# Altium PCB ePBR25_ACU_Power_rev0.PcbDoc (part 3 of 5)
Units mil, origin at the board's own origin, x right, y up, seen from the top; angles counter-clockwise.
Board outline 8211 x 3959 mil, 2 copper layers (Top Layer, Bottom Layer); 145 components, 129 nets, 544 pads, 1610 vias.
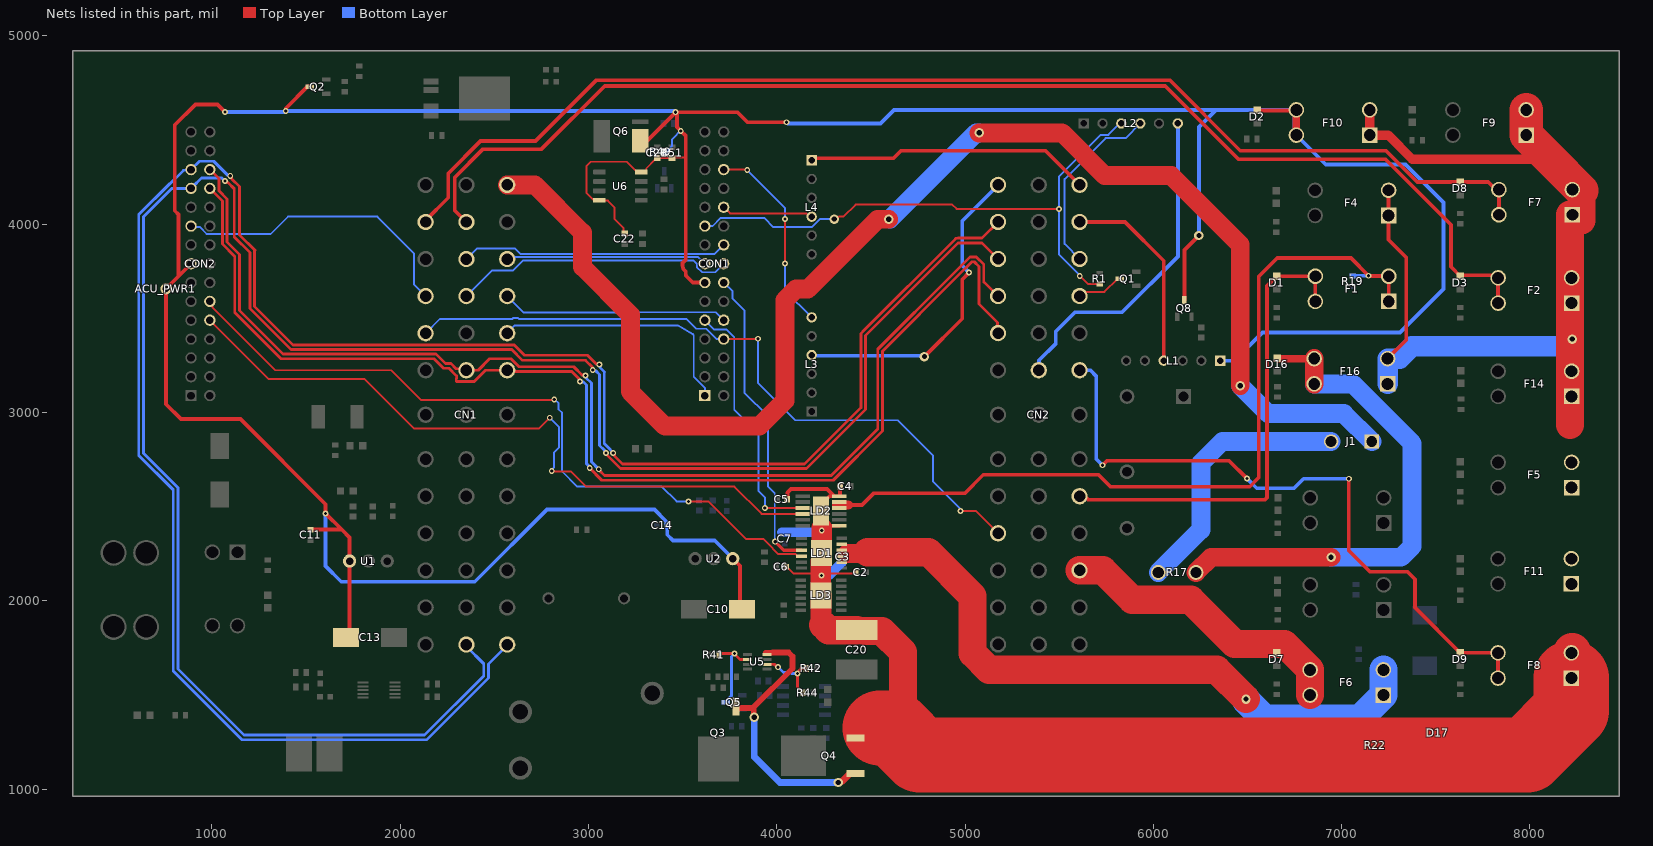
[diagram p2: the nets of this part, all layers, seen from the top]

## Via types
v1: diameter 31, hole 17, Top Layer to Bottom Layer, 1578 vias
v2: diameter 50, hole 28, Top Layer to Bottom Layer, 24 vias
v3: diameter 30, hole 15, Top Layer to Bottom Layer, 3 vias
v4: diameter 170, hole 128, Top Layer to Bottom Layer, 2 vias
v5: diameter 250, hole 137, Top Layer to Bottom Layer, 2 vias
v6: diameter 60, hole 34, Top Layer to Bottom Layer, 1 vias

## Nets (pads, with @x,y where several pads share a name; then routed paths per layer and width w, separated by ;. In a path a pad name is that pad's centre, name@x,y a point inside that pad or via, vN(x,y) a via of type N, cw(c..) or ccw(c..) an arc to the next point about the centre after c; other vN are vias at no path point) (continued)
ACU_PWR: ACU_PWR1.1 C10.1 C11.2 C13.1 C14.2 C21.2 C22.2 CON1.A7 CON2.A8 D2.1 F10.3 F10.4 L1.1 Q2.3 Q6.1-3 Q8.3 R49.2 R51.2 U1.1 U2.1 U6.4 U6.8 | length 19688.4
  Top Layer w10: C22.2@3192.56,3955 3191.89,3955 3185.58,3961.31 3185.58,3979.89 3148.19,4017.28 3137.44,4028.03 3137.44,4090.12 3102.56,4125 3030,4125 2990,4165 2990,4310 3011.36,4331.36 3203.64,4331.36 3260,4275 U6.4@3276.22,4275 ; U6.4@3280,4277 3298.86,4277 3306.66,4284.8 3306.66,4295.71 3352.49,4341.54 3363.24,4352.29 C21.2@3365.21,4352.29 R51.2@3443.7,4352.29 3446.41,4355 3517,4355
  Top Layer w20: CON2.A8@889,3790 822.5,3723.5 ; v1@1069,4598.98 v1(1069,4596) 1029,4636 912.18,4636 802.82,4526.63 802.82,4071.37 822.5,4051.68 822.5,3723.5 ; v1(1391.91,4600.97) 1391.91,4615.03 1507.88,4731 Q2.3@1518.71,4731 ; C11.2@1523.7,2377.84 1689.22,2377.84 ; C13.1@1712.05,1805 1731,1823.95 U1.1@1731,2211 1731,2336.06 1689.22,2377.84 ; Q6.1-3@3310.51,4441.16 v1@3462.4,4593.05 ; v1@3469.38,4585.05 3469.38,4515.62 v1(3490,4495) 3517,4468 3517,4355 3517,3811.96 3499,3793.96 3499,3779.88 3503.01,3761.89 3517,3747.9 3517,3727.04 3522.86,3721.18 3554.04,3690 CON1.A7@3618.02,3690 ; v1@3469.38,4595 3790,4595 3844.02,4540.98 v1(4051,4540.98) ; U2.1@3766,2224 3804.38,2185.62 3804.38,1966.57 C10.1@3815.95,1955 ; Q8.3@6164.92,3597.14 6164.92,3862.77 v2(6241.88,3939.72) ; D2.1@6551,4604.46 F10.4@6756.65,4604.46 ; 822.5,3723.5 ACU_PWR1.1@756,3657 756,3044 835.26,2964.74 1151.21,2964.74 1603.06,2512.9 v1(1603.06,2464) 1689.22,2377.84
  Top Layer w40: F10.4@6756.65,4604.46 F10.4@6759.12,4606.93 F10.3@6759.12,4473.07
  Bottom Layer w10: R49.2@3411.47,4385.42 3443.7,4417.66 3443.7,4451.14 3452.56,4460 3487.56,4495 v1(3490,4495)
  Bottom Layer w20: v1(1069,4596) 1383.97,4596 1388.94,4600.97 v1(1391.91,4600.97) 3453.46,4600.97 3459.43,4595 v1(3462.4,4595) ; v1(1603.06,2464) 1603.06,2184.24 1686.38,2100.92 2396.2,2100.92 2779.53,2484.25 3349.81,2484.25 3413,2421.06 3413,2405 C14.2@3418,2400 3418,2350.46 3448.96,2319.5 3670.5,2319.5 U2.1@3766,2224 ; CON1.A7@3618.02,3690 CON1.A7@3628.9,3690 ; v1(4051,4540.98) 4053.98,4540.98 4059.96,4535 4550.96,4535 4622.89,4606.93 6332.14,4606.93 ; v2(6241.88,3939.72) 6241.88,4516.66 6332.14,4606.93 ; L1.1@6355,3275 6429,3275 6579,3425 7309.7,3425 7540.04,3655.34 7540.04,4115.38 7338.42,4317 6915.19,4317 F10.3@6759.12,4473.07 ; F10.4@6759.12,4606.93 6332.14,4606.93
  Bottom Layer w40: F10.3@6759.12,4473.07 F10.4@6759.12,4606.93
AIR+_CTRL: CN1.8 CON1.B9 | length 1420.9
  Bottom Layer w10: CN1.8@2351.54,3814.77 2406.84,3870.08 2609.92,3870.08 2638,3842 3670.02,3842 CON1.B9@3718.02,3890
AIR+_FB: CN1.10 CON1.B5 | length 1204.4
  Bottom Layer w10: CN1.10@2568.07,3617.92 2655.49,3530.5 3164.74,3530.5 3166.5,3532.26 3675.75,3532.26 CON1.B5@3718.02,3490
AIR-_CTRL: CN1.11 CON1.B8 | length 1499.6
  Bottom Layer w10: CN1.11@2351.54,3617.92 2488.61,3755 2600,3755 2653,3808 3557,3808 3575.9,3789.1 3575.9,3772.55 3603.45,3745 3673.02,3745 CON1.B8@3718.02,3790
AIR-_FB: CN1.15 CN2.30 CON1.B4 | length 3774.1
  Top Layer w10: CON1.B4@3719,3390 3719.94,3390.94 3898.98,3390.94 v1(3899.92,3391.89) ; v1(4975.4,2477) 5056.39,2477 5175.31,2358.08 CN2.30@5175.98,2358.08
  Bottom Layer w10: CN1.15@2135,3421.07 2210.43,3496.5 2595.42,3496.5 2601.32,3502.4 2625.34,3502.4 2631.24,3496.5 3521.5,3496.5 3524.43,3493.57 3573,3445 3626.08,3445 3681.08,3390 CON1.B4@3718.02,3390 ; v1(3899.92,3391.89) 3899.92,3157.69 4099.11,2958.5 4643.5,2958.5 4829,2773 4829,2634.73 4971.38,2492.35 4971.38,2481.02 v1(4975.4,2477)
AMBER_LED_GND: CN2.4 L1.4 | length 1091.6
  Top Layer w20: CN2.4@5608,4012 5848.84,4012 6055,3805.84 L1.4@6055,3275
  Bottom Layer w10: CN2.4@5602.65,4018.5 5592.5,4018.5 5599,4012 CN2.4@5608,4012
AMS_CLR_ERR: CN1.7 CON1.A8 | length 1068.7
  Bottom Layer w10: CN1.7@2568.07,3814.77 2578.3,3825 3583.02,3825 CON1.A8@3618.02,3790
AMS_LED: CN2.1 L4.1 | length 1520
  Top Layer w20: L4.1@4185,4340 4195,4350 4620,4350 4660,4390 5427.53,4390 CN2.1@5609.06,4208.47
AMS_OK: CON1.B11 L4.4 | length 486.7
  Top Layer w10: CON1.B11@3719,4090 3752,4057 4156.62,4057 4173.62,4040 L4.4@4185,4040
AMS_PWR: CN1.5 D3.1 F2.3 F2.4 | length 6689.3
  Top Layer w20: CN1.5@2351.54,4011.62 2290,4073.16 2290,4248.47 2440.09,4398.55 2751.05,4398.55 3086.5,4734 6063,4734 6452,4345 7232.15,4345 7580,3997.15 7580,3773.46 D3.1@7630,3723.46 7635.43,3728.9 F2.4@7830.12,3728.9 ; F2.3@7830.12,3589.61 F2.4@7830.12,3723.46
B\R\A\K\E\_\P\R\E\S\S\: CN2.10 Q1.3 | length 249.8
  Top Layer w10: CN2.10@5609.06,3617.92 5631.13,3640 5739.88,3640 5809.88,3710 Q1.3@5820.71,3710
BRAKE_LIGHT_GND: CN2.17 L2.6 | length 1763.3
  Bottom Layer w20: CN2.17@5392.52,3224.22 5392.52,3277.35 5482,3366.83 5482,3431 5582.97,3531.97 5833.97,3531.97 6130,3828 L2.6@6130,4535
BRAKE_PRESS: CON1.A10 L2.3 R1.1 | length 3121.9
  Top Layer w10: v2(4305,4027) 4315.82,4027 4328.82,4040 4353.89,4040 4418.32,4104.44 4931.38,4104.44 4954.82,4081 v1(5498,4081) ; v1(5609.06,3725) 5651.61,3682.44 R1.1@5715,3682.44
  Bottom Layer w10: CON1.A10@3618.02,3990 3658.45,3990 3700.57,4032.12 3935.15,4032.12 3982.27,3985 4185.89,3985 4227.89,4027 v2(4305,4027) ; v1(5609.06,3725) 5609.06,3729.6 5498,3840.66 v1(5498,4081) 5498,4252 5720,4474 5761,4474 5822,4535 L2.3@5830,4535
BRAKE_PWR: CN2.16 D9.1 F8.3 F8.4 | length 3607.1
  Top Layer w20: v1(5730,2720) 5730.07,2720 5754.07,2744 6402,2744 v1(6497,2649) ; v1(7038,2648) 7038,2267 7150.65,2154.35 7349.2,2154.35 7389.02,2114.53 7389.02,1964.44 D9.1@7630,1723.46 F8.4@7830.12,1723.46 F8.3@7830.12,1589.61
  Bottom Layer w20: CN2.16@5609.06,3224.22 5665.78,3224.22 5696,3194 5696,2754 v1(5730,2720) ; v1(6497,2649) 6548.5,2597.5 6747.5,2597.5 6798,2648 v1(7038,2648)
BRAKE_SENS: CN2.7 L2.4 | length 982
  Bottom Layer w10: CN2.7@5609.06,3814.77 5528.5,3895.33 5528.5,4239.5 5746,4457 5852,4457 L2.4@5930,4535
BSPD_LED: CN2.3 L3.4 | length 1706.4
  Top Layer w20: v2(4784,3297) 4985,3498 4985,3707.04 v1(5021.48,3743.52)
  Bottom Layer w20: L3.4@4185,3305 4189,3301 4780,3301 v2(4784,3297) ; v1(5021.48,3743.52) 4985,3780 4985,4017.49 CN2.3@5175.98,4208.47
BSPD_OK: CON1.B13 L3.6 | length 1049.9
  Top Layer w10: CON1.B13@3718.02,4290 3718.47,4289.55 3840.45,4289.55 v1(3843,4287) ; v1(4043,3790.98) v1(4043,4027.98)
  Bottom Layer w10: v1(3843,4287) 4043,4087 v1(4043,4027.98) ; v1(4043,3790.98) 4043,3647 L3.6@4185,3505
BSPD_TEST: CN1.1 J1.1 | length 7535.3
  Top Layer w100: CN1.1@2568.07,4208.47 2714.53,4208.47 2968,3955 2968,3773.13 3222.28,3518.85 3222.28,3110.69 3405.61,2927.36 3907.68,2927.36 4043,3062.68 4043,3596.5 4101.58,3655.08 4164.08,3655.08 4535.49,4026.49 v2(4594.09,4026.49) ; v2(5074.51,4485) 5515,4485 5742,4258 6094.83,4258 6461.53,3891.3 v2(6461.53,3142.46)
  Bottom Layer w100: v2@4602.09,4027.98 5059.11,4485 v2(5074.51,4485) ; v2(6461.53,3142.46) 6609.76,2994.23 7012.04,2994.23 J1.1@7160.27,2846
BSPD_TEST_OUT: J1.2 R17.2 | length 1413.6
  Bottom Layer w100: R17.2@6025.99,2150.41 6252,2376.42 6252,2731 6367,2846 J1.2@6943.74,2846
BSPD_TEST_PWR: D16.1 F16.3 F16.4 R17.1 | length 2730.3
  Top Layer w40: D16.1@6660.43,3285.93 F16.4@6854.12,3285.93
  Top Layer w100: R17.1@6225.99,2150.41 6306.58,2231 v2(6943.74,2231) ; F16.3@6854.12,3152.07 F16.4@6854.12,3285.93
  Bottom Layer w100: F16.3@6854.12,3152.07 7057.93,3152.07 7373.9,2836.1 7373.9,2289.58 7315.32,2231 v2(6943.74,2231)
BUZR_CTRL: CON1.A5 LD2.3 | length 1369
  Top Layer w10: v1(3936.5,2492.75) LD2.3@4137.56,2492.75
  Bottom Layer w10: CON1.A5@3618.02,3490 3668.02,3440 3734.17,3440 3773.92,3400.25 3773.92,3014.88 3902.92,2885.88 3902.92,2582.79 3936.5,2549.21 v1(3936.5,2492.75)
BUZR_FB: CON2.B5 LD2.4 | length 3813.4
  Top Layer w10: CON2.B5@989,3490 1302,3177 1810.5,3177 2073.5,2914 2736.74,2914 v1(2794.53,2971.78) ; v1(2805,2690) 2813,2690 2814,2691 2817.5,2687.5 2906.39,2687.5 2916.89,2677 2917.12,2677 2987.82,2606.3 3774.77,2606.3 3919.35,2461.72 4137.09,2461.72 LD2.4@4137.56,2461.25
  Bottom Layer w10: v1(2794.53,2971.78) 2842.5,2923.81 2842.5,2813.08 2816.5,2787.08 2816.5,2707.18 2805,2695.68 v1(2805,2690)
BUZR_FUSE: F1.1 F1.2 LD2.10 LD2.11 R19.1 | length 4414.3
  Top Layer w20: 4367.58,2507.24 4368.84,2508.5 ; 4379.66,2508.5 4452.11,2508.5 4514.15,2570.54 4997.74,2570.54 5096.44,2669.24 5709.13,2669.24 5772.37,2606 6512.04,2606 6558.96,2652.92 6558.96,3720.96 6658,3820 7049,3820 v1(7143,3726) 7144.27,3724.73 7248.61,3724.73 F1.2@7249.88,3723.46 F1.1@7249.88,3589.61
  Top Layer w50: 4317.36,2508.5 4379.66,2508.5
  Bottom Layer w20: R19.1@7058.22,3725.78 7142.78,3725.78 v1(7143,3726)
BUZR_PWR: CN2.25 D1.1 F1.3 F1.4 | length 2542.1
  Top Layer w20: CN2.25@5609.06,2554.93 5621.42,2542.56 5647.46,2542.56 5653.02,2537 6592.28,2537 6604,2548.72 6604,3672.46 D1.1@6655,3723.46 F1.4@6860.12,3723.46 F1.3@6860.12,3589.61
CAN_N: CN1.37 CN2.6 CON2.A13 | length 11361.9
  Top Layer w15: v1(1097.65,4256.77) 1097.65,4252.44 1105.18,4244.91 1105.18,4240.56 1146.19,4199.54 1146.19,3943.42 1228,3861.61 1226.97,3860.57 1226.97,3562.18 1430.18,3358.97 2603.08,3358.97 2604.11,3360 2660.24,3303.87 2995.19,3303.87 3041,3258.06 3054.5,3258.06 v1(3057.56,3255) ; v1(3130.91,2785.24) 3130.91,2780.91 3138.41,2773.41 3138.41,2768.99 3180.48,2726.91 4147.93,2726.91 4446.58,3025.56 4446.58,3419.74 4461.22,3434.39 4937.57,3910.74 4952.22,3925.38 4961.57,3925.38 4961.98,3925.8 5090.16,3925.8 CN2.6@5175.98,4011.62
  Bottom Layer w15: v1(1097.65,4256.77) 1094.59,4259.83 1084.14,4259.83 1009.35,4334.62 933.62,4334.62 CON2.A13@889,4290 885.07,4286.07 848.52,4286.07 777.45,4215 776.17,4215 611,4049.83 611,4039.47 611,2783.39 611,2773.03 794.28,2589.75 794.28,1627.37 1152.85,1268.79 1160.17,1261.47 2139.97,1261.47 2468.59,1590.09 2468.59,1663.97 2561.38,1756.76 2561.38,1759.82 CN1.37@2568.07,1767.53 ; v1(3057.56,3255) 3060.62,3251.94 3060.62,3239.24 3084.94,3214.92 3083.69,3213.68 3083.69,2835.1 3104.76,2814.03 3130.91,2787.88 v1(3130.91,2785.24)
CAN_P: CN1.38 CN2.9 CON2.A12 | length 11163.8
  Top Layer w15: v1(1069,4229.17) 1073.33,4229.17 1080.86,4221.64 1085.21,4221.64 1118.7,4188.15 1118.7,3932.03 1201.97,3848.76 1201.97,3551.83 1419.83,3333.97 2592.15,3333.97 2649.11,3277 2984.06,3277 3019.5,3241.56 3019.5,3228.06 v1(3022.56,3225) ; v1(3092.34,2784.03) 3092.34,2779.7 3113.41,2758.63 3170.13,2701.91 4158.28,2701.91 4471.58,3015.21 4471.58,3409.39 4962.57,3900.38 5089.69,3900.38 CN2.9@5174.93,3815.15
  Bottom Layer w15: v1(1069,4229.17) 1068.43,4229.17 1052.21,4245.38 944.38,4245.38 897.96,4198.96 889,4198.96 CON2.A12@889,4190 786.53,4190 636,4039.47 636,2783.39 819.28,2600.11 819.28,1637.72 1170.53,1286.47 2129.61,1286.47 2443.59,1600.45 2443.59,1665.83 CN1.38@2351.54,1757.88 ; v1(3022.56,3225) 3025.62,3221.94 3038.32,3221.94 3058.69,3201.57 3058.69,2824.75 3084.34,2799.1 3084.34,2796.36 3092.34,2788.36 v1(3092.34,2784.03)
CAN_SENS_N: CN1.17 CN2.12 CON2.B13 | length 6375.8
  Top Layer w15: CON2.B13@989,4290 1037,4242 1037,4177.36 1080.39,4133.97 1080.39,3905.37 1146.19,3839.56 1146.19,3541.93 1377.62,3310.5 1786.75,3310.5 2189.85,3310.5 2240.33,3260.03 2269.33,3260.03 2296.8,3232.56 2343.2,3232.56 CN1.17@2351.54,3224.22 2414.22,3224.22 2475,3285 2589.04,3285 2631.1,3242.95 2921.4,3242.95 2964.53,3199.81 2981,3199.81 v1(2984.06,3196.75) ; v1(3054.5,2698.84) 3054.5,2695.94 3085.22,2665.22 4289.22,2665.22 4536,2912 4536,3335.82 4935.5,3735.32 5025.8,3825.63 5058.94,3825.63 5099.51,3785.06 5099.51,3693.72 CN2.12@5174.93,3618.3
  Bottom Layer w15: v1(2984.06,3196.75) 2987.12,3193.69 2987.12,3183.69 3015.14,3155.67 3015.14,2738.19 v1(3054.5,2698.84)
CAN_SENS_P: CN1.16 CN2.15 CON2.B12 | length 6493.7
  Top Layer w15: CON2.B12@989,4190 1055.39,4123.61 1055.39,3895.01 1121.19,3829.21 1121.19,3531.57 1367.26,3285.5 1797.11,3285.5 2168.03,3285.5 2179.5,3285.5 2229.97,3235.03 2258.98,3235.03 2299.88,3194.13 2299.88,3181.7 2297.8,3179.63 2297.8,3167.2 2300,3165 2393.46,3165 2452.68,3224.22 CN1.16@2568.07,3224.22 2574.34,3217.95 2911.04,3217.95 2951,3177.99 2951,3167.39 v1(2954.06,3164.33) ; v1(3006.39,2704.52) 3070.69,2640.22 4299.57,2640.22 4561,2901.64 4561,3325.47 4960.5,3724.97 5036.16,3800.63 5048.59,3800.63 5074.51,3774.71 5074.51,3576.9 5172.94,3478.47 5172.94,3424.11 CN2.15@5175.98,3421.07
  Bottom Layer w15: v1(2954.06,3164.33) 2957.12,3161.27 2974.19,3161.27 2990.14,3145.32 2990.14,2727.84 2998.39,2719.59 2998.39,2716.85 3006.39,2708.85 v1(3006.39,2704.52)
DELAYED_UV: Q5.3 R41.2 U5.2 | length 438.6
  Top Layer w10: R41.2@3692.83,1713.95 R41.2@3699.3,1720.42
  Top Layer w15: R41.2@3699.3,1720.42 v1(3775.08,1720.42) ; v1@3774.77,1717.97 3804.38,1688.36 U5.2@3844.03,1688.36
  Bottom Layer w15: Q5.3@3730,1467 3759,1496 3759,1703.63 3775.08,1719.72 v1(3775.08,1720.42)
EMETER_PWR: CN1.6 D8.1 F7.3 F7.4 | length 6467.3
  Top Layer w20: CN1.6@2135,4020 2255.26,4140.26 2255.26,4269.46 2426.96,4441.16 2718.65,4441.16 3042.49,4765 6086.53,4765 6461.53,4390 7235.18,4390 7401.71,4223.46 D8.1@7630,4223.46 7778.55,4223.46 7818.16,4183.86 F7.4@7835.12,4183.86 F7.3@7835.12,4050
  Bottom Layer w20: CN1.6@2135,4011.62 CN1.6@2135,4020
EXTRA_INPUT1: CN1.13 CON1.A1 | length 1368.1
  Bottom Layer w10: CN1.13@2568.07,3421.07 2609.5,3462.5 3473.79,3462.5 3553.04,3416.88 3558.9,3411.02 3558.9,3189.55 3618.02,3130.44 CON1.A1@3618.02,3090
EXTRA_INPUT2: CN1.12 CON2.A10 | length 1573.5
  Bottom Layer w10: CON2.A10@889,3990 893.68,3985.32 934.12,3985.32 971.55,3947.88 1311.9,3947.88 1404.02,4040 1878.66,4040 2072.92,3845.74 2072.92,3680 CN1.12@2135,3617.92
F\A\U\L\T\2\: R42.2 R44.1 U5.6 | length 360.3
  Top Layer w10: U5.6@3947.18,1662.77 U5.6@3947.32,1662.62 ; v1@4001.32,1647.5 v1(4007,1647.5) ; 4109.45,1542.8 4137.43,1514.83 R44.1@4137.43,1510.89 ; v1(4109.45,1613.61) v1@4109.45,1619.29
  Top Layer w15: U5.6@3947.32,1662.62 3986.19,1662.62 v1@4001.32,1647.5 ; 4109.45,1542.8 v1(4109.45,1613.61) ; v1@4109.45,1619.29 4127.2,1637.04 4127.2,1640.71 R42.2@4156.13,1640.71
  Bottom Layer w15: v1(4007,1647.5) 4036.22,1618.28 4073.95,1618.28 4078.63,1613.61 v1(4109.45,1613.61)
FANS_CTRL: CON1.B7 LD1.3 | length 1647.3
  Top Layer w18: v1(3991.32,2314) 4036.83,2268.49 LD1.3@4130.5,2268.49
  Bottom Layer w10: CON1.B7@3718.02,3690 3765,3643.02 3765,3605.09 3828.13,3541.95 3828.13,3144.39 3828,3144.25 3828,3104.99 3953.92,2979.06 3953.92,2605.29 3989,2570.21 3989,2316.32 v1(3991.32,2314)
FANS_FB: CON2.B6 LD1.4 | length 3916.9
  Top Layer w10: CON2.B6@989,3590 989,3576.41 1002.16,3563.24 1002.16,3559.36 1337.3,3224.22 1953.66,3224.22 2112.88,3065 2113.18,3065.31 2814.81,3065.31 v1(2818,3068.5) ; v1(3531,2528) 3636.04,2528 3835.54,2328.5 3927.58,2328.5 3949.02,2307.07 4008.1,2247.99 4027.64,2247.99 4028.14,2247.49 4100.89,2247.49 4106.75,2241.63 4106.75,2240.99 4110.75,2236.99 LD1.4@4130.5,2236.99
  Bottom Layer w10: v1(2818,3068.5) 2821.5,3068.5 2841.5,3048.5 2841.5,3015.79 2859.5,2997.79 2859.5,2686.54 2939.74,2606.3 3389.16,2606.3 3467.46,2528 v1(3531,2528)
FANS_FUSE: D17.2 F6.1 F6.2 LD1.8 LD1.9 LD1.10 LD1.11 R22.2 | length 3884.4
  Top Layer w100: 4374.51,2250.82 4474.03,2250.82
  Top Layer w150: 4481.31,2258.1 4805.51,2258.1 5039.54,2024.07 5039.54,1721.87 5127.41,1634 6335.96,1634 v2(6492,1477.96)
  Bottom Layer w100: 7097.59,1375 7177.59,1295 D17.2@7377.14,1295
  Bottom Layer w150: v2(6492,1477.96) 6492,1472 6589,1375 7097.59,1375 F6.1@7221.88,1499.29 F6.2@7221.88,1633.15
FANS_PWR: CN2.31 D7.1 F6.3 F6.4 | length 1577.8
  Top Layer w150: CN2.31@5608,2161.61 5731.39,2161.61 5888.13,2004.87 6198.21,2004.87 6432.37,1770.71 6696.16,1770.71 6832.12,1634.75 F6.4@6832.12,1633.15 F6.3@6832.12,1499.29
GATE: Q3.1 Q4.1 U5.8 | length 1476.2
  Top Layer w30: Q3.1@3784,1430.73 3877.93,1430.73 ; v2@3877.95,1384.37 3877.95,1435.14 4083.14,1640.33 4083.14,1704.5 4062.64,1725 3978.98,1725 ; 3940.92,1723.58 3977.56,1723.58
  Top Layer w35: v2@3877.95,1384.37 v2(3880.82,1381.5) ; v2(4325.98,1034.95) 4328.85,1037.82 4343.01,1037.82 4388.14,1082.95 Q4.1@4417.64,1082.95
  Bottom Layer w35: v2(3880.82,1381.5) 3880.82,1170.56 4016.42,1034.95 v2(4325.98,1034.95)
GLV: C2.2 C3.2 C4.2 C5.2 C6.2 C7.2 C20.1 F2.1 F2.2 F4.1 F4.2 F5.1 F5.2 F7.1 F7.2 F8.1 F8.2 F9.1 F9.2 F10.1 F10.2 F11.1 F11.2 F14.1 F14.2 F16.1 F16.2 LD1.EPAD LD2.7 LD2.12 LD2.13 LD3.EPAD Q4.2 | length 11973.7
  Top Layer w11: C6.2@4053.5,2180.68 4090.12,2144.06 4222.87,2144.06 4232.57,2134.36 4234,2134.36 v1(4237.99,2134.36) ; 4270.9,2144.44 C2.2@4419.65,2144.44
  Top Layer w20: C5.2@4055.06,2540.06 4056.75,2541.75 4056.75,2574.25 4075.5,2593 4266.56,2593 4303.82,2555.74 LD2.12@4332.44,2555.74 4335.28,2555.74 4335.44,2555.9 C4.2@4335.44,2608 ; LD2.13@4235,2477 4235,2510.46 4280.12,2555.58 LD2.12@4303.82,2555.58 ; 4280.12,2398.42 4332.28,2398.42 LD2.7@4332.44,2398.26 ; F16.2@7243.88,3285.93 7342.96,3385.01 7342.96,3822.83 7248.88,3916.91 F4.1@7248.88,4046.07 F4.2@7248.88,4179.93
  Top Layer w50: F10.2@7148.88,4606.93 F10.1@7148.88,4473.07 7246.83,4473.07 7374.9,4345 8108,4345
  Top Layer w110: LD3.EPAD@4234,2029.24 4234,2134.36 4234,2210.27 LD1.EPAD@4237.75,2206.52 ; 4234.75,1888 LD3.EPAD@4234.75,2029.24 ; LD1.EPAD@4237.75,2248.79 LD1.EPAD@4237.75,2206.52 ; LD1.EPAD@4237.99,2206.29 LD1.EPAD@4237.75,2206.52 ; LD1.EPAD@4238,2301 4238,2362.4 4238.34,2362.74 v1@4238.34,2387.56 ; Q4.2@4417.64,1270.95 4493.14,1270.95 4670.74,1448.56
  Top Layer w150: 4247.28,1871.15 4274.84,1843.59 C20.1@4424,1843.59 ; C20.1@4467.52,1840.16 4557.58,1840.16 4670.74,1727 4670.74,1448.56 ; 8213,2934.5 8213,3390 8213,3714.86 F7.1@8213,4050 ; 8274,4021 8274,4179
  Top Layer w180: F9.2@7980,4606.86 F9.1@7980,4473 8108,4345 8274,4179
  Top Layer w200: F8.1@8224.88,1629.88 F8.2@8224.88,1728.9
  Top Layer w400: 4547.96,1324.8 4615.86,1324.8 4759.66,1181 4880.11,1181 7985.57,1181 8219.88,1415.31 F8.1@8219.88,1589.61
  Bottom Layer w50: 4026,2365 4231,2365 v1(4239,2373) ; v1(4237.99,2134.36) 4276.61,2134.36 C3.2@4347.82,2205.57
  Bottom Layer w110: F16.1@7243.88,3152.07 F16.2@7243.88,3285.93 7307.83,3285.93 7373.38,3351.48 8186.48,3351.48 v2(8225,3390)